# Altium PCB DB42.PcbDoc (part 7 of 8)
Units mil, origin at the board's own origin, x right, y up, seen from the top; angles counter-clockwise.
Board outline 3236.22 x 4456.69 mil, 8 copper layers (Top Layer, MidLayer1, MidLayer2, GND-Layer5, MidLayer3, VCC, MidLayer4, Bottom Layer), stack 62.194 mil thick; 214 components, 470 nets, 1802 pads, 1663 vias.
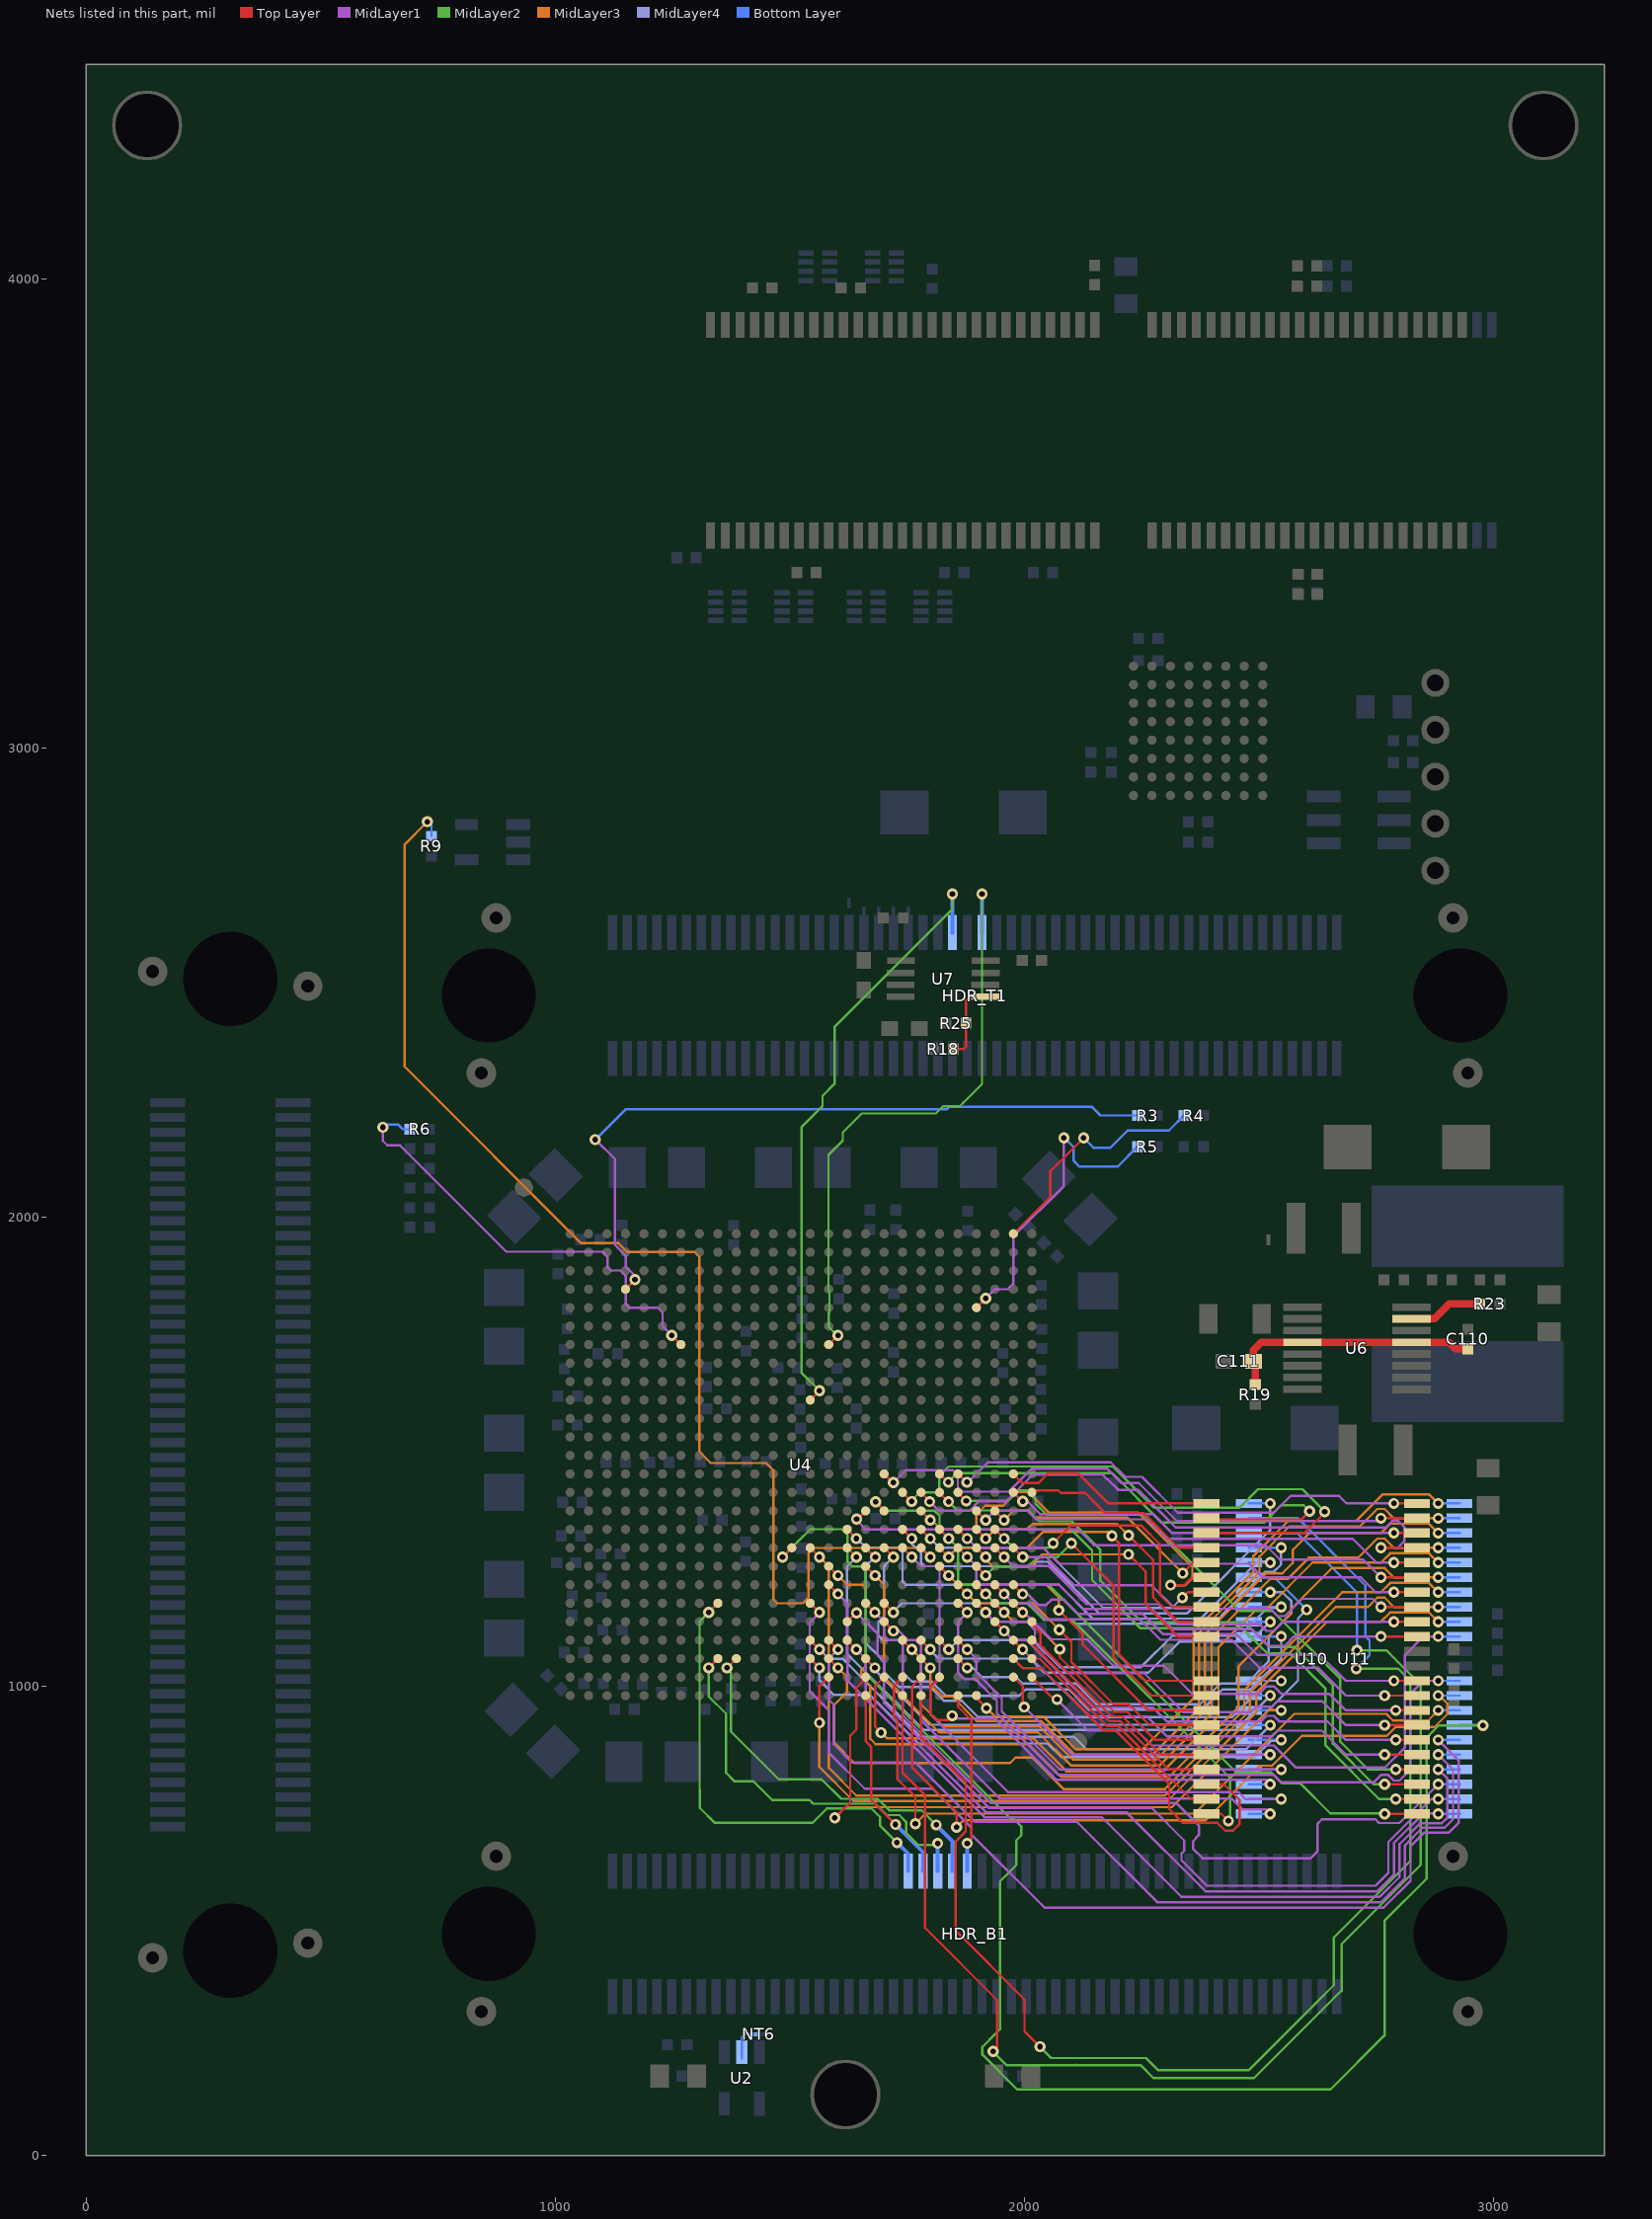
[diagram p13: the nets of this part, all layers, seen from the top]

## Via types
v1: diameter 23.62, hole 11.81, Top Layer to Bottom Layer, 1081 vias
v2: diameter 23.62, hole 11.81, Top Layer to Bottom Layer, tented both sides, 466 vias
v3: diameter 27.56, hole 15.75, Top Layer to Bottom Layer, 116 vias

## Nets (pads, with @x,y where several pads share a name; then routed paths per layer and width w, separated by ;. In a path a pad name is that pad's centre, name@x,y a point inside that pad or via, vN(x,y) a via of type N, cw(c..) or ccw(c..) an arc to the next point about the centre after c; other vN are vias at no path point) (continued)
SPI_MODE: HDR_T1.52 U4.G15 | length 1310.7
  Top Layer w5: U4.G15@1582.68,1728.35 v1(1602.36,1748.03)
  MidLayer2 w5: v1(1602.36,1748.03) 1600.52,1748.03 1592.34,1756.21 1583.05,1765.5 1583.05,1795.6 1584.24,1796.78 1584.24,1843.03 1582.3,1844.97 1582.3,2132.33 1612.78,2162.8 1612.78,2180.54 1653.12,2220.89 1811.05,2220.89 1826.28,2236.13 1861.72,2236.13 1868.9,2243.31 ; 1869.09,2243.11 1909.45,2283.47 v2(1909.45,2688.98)
  Bottom Layer w7.87: HDR_T1.52@1909.45,2606.3 v2(1909.45,2688.98)
SPI_SEL: HDR_T1.48 U4.K14 | length 1318.3
  Top Layer w5: U4.K14@1543.31,1610.24 v1(1562.99,1629.92)
  MidLayer2 w5: v1(1562.99,1629.92) 1525.2,1667.72 1525.2,2192.35 1569.44,2236.59 1569.44,2258.24 1595.06,2283.86 1595.06,2405.41 1846.46,2656.8 v2(1846.46,2688.98)
  Bottom Layer w7.87: HDR_T1.48@1846.46,2606.3 v2(1846.46,2688.98)
SRAM1_A0: U4.AB18 U11.1 | length 1130.6
  Top Layer w5: U4.AB18@1700.79,1137.8 v1(1720.47,1118.11)
  MidLayer1 w5: v1(1720.47,1118.11) 1732.28,1118.11 1751.97,1098.43 1768.11,1098.43 1779.15,1087.38 1779.15,928.72 1946.85,761.02 2441.14,761.02 2464.13,738.03 2513.94,738.03 v1(2523.62,728.35)
  Bottom Layer w5: U11.1@2478.44,728.34 v1(2523.62,728.35)
SRAM1_A1: U4.V19 U11.2 | length 1306.2
  Top Layer w5: U4.V19@1740.16,1295.28 v1(1759.84,1275.59)
  MidLayer1 w5: v1(1759.84,1275.59) 1779.53,1255.91 1812.2,1255.91 1818.9,1249.21 1818.9,1016.93 1799.7,997.74 1799.7,939.67 1964.96,774.41 2456.04,774.41 2470.61,759.84 v1(2547.24,759.84)
  Bottom Layer w5: U11.2@2478.44,759.83 v1(2547.24,759.84)
SRAM1_A2: U4.AE21 U11.3 | length 926
  Top Layer w5: U4.AE21@1818.9,1019.68 1818.9,1018.9 1799.13,999.13 1799.13,941.42 1812.49,928.06 1836.32,928.06 v1(1845.61,937.34)
  MidLayer1 w5: v1(1845.61,937.34) 1851.46,931.5 1936.63,931.5 2067.1,801.02 2513.94,801.02 v1(2523.62,791.34)
  Bottom Layer w5: U11.3@2478.44,791.33 v1(2523.62,791.34)
SRAM1_A3: U4.AC22 U11.4 | length 906.3
  Top Layer w5: U4.AC22@1858.27,1098.42 v1(1877.95,1078.74)
  MidLayer1 w5: v1(1877.95,1078.74) 1897.26,1059.43 1897.26,1029.53 1951.57,975.22 1951.57,946.46 2075.2,822.83 v1(2547.24,822.83)
  Bottom Layer w5: U11.4@2478.44,822.83 v1(2547.24,822.83)
SRAM1_A4: U4.AE25 U11.5 | length 684.7
  Top Layer w5: U4.AE25@1976.38,1019.68 1996.46,999.61 1996.46,959.06 v1(1999.61,955.91)
  MidLayer1 w5: v1(1999.61,955.91) 2101.18,854.33 v1(2523.62,854.33)
  Bottom Layer w5: U11.5@2478.44,854.32 v1(2523.62,854.33)
SRAM1_A5: U4.U16 U11.18 | length 1110.9
  Top Layer w5: U4.U16@1622.05,1334.65 v1(1641.73,1314.96)
  MidLayer4 w5: v1@1642.52,1314.96 1662.2,1295.28 1731.89,1295.28 1740.16,1287.01 1740.16,1223.23 1746.85,1216.54 2072.98,1216.54 2145.16,1144.35 2375.45,1144.35 2496.85,1265.75 v1@2521.85,1265.75
  Bottom Layer w5: U11.18@2478.44,1263.77 v1(2523.83,1263.77)
SRAM1_A6: U4.AA18 U11.19 | length 1037.2
  Top Layer w5: U4.AA18@1700.79,1177.17 v1(1720.47,1157.48)
  MidLayer4 w5: v1@1719.68,1158.27 1738.58,1177.17 2006.07,1177.17 2040.82,1142.42 ; 2040.82,1141.44 2096.9,1141.44 2104.78,1133.57 2403.91,1133.57 2420.64,1150.3 ; 2420.11,1150.82 2453.95,1184.66 2513.61,1244.32 2531.72,1244.32 2546.85,1259.45 v1@2546.85,1294.88
  Bottom Layer w5: U11.19@2478.44,1295.27 v1(2547.24,1295.28)
SRAM1_A7: U4.AF19 U11.20 | length 2986.5
  Top Layer w5: U4.AF19@1740.16,980.31 1740.16,815.75 1788.19,767.72 1788.19,485.04 1941.73,331.5 1941.73,230.71 v1(1933.07,222.05)
  MidLayer2 w5: v1@1932.28,222.44 1932.28,222.05 1932.28,221.65 1932.48,221.46 1961.02,192.91 2107.87,192.91 ; 2108.27,193.31 2107.87,192.91 ; 2675.98,350.39 2675.98,351.97 ; v1(2708.66,1076.77) 2771.26,1076.77 2788.34,1059.69 2844.49,1003.54 2844.49,825.98 ; 2844.09,826.38 2844.49,825.98 ; 2107.87,192.91 2247.24,192.91 2274.8,165.35 2489.37,165.35 2675.98,351.97 ; 2675.98,351.97 2675.98,450.79 2844.49,619.29 2844.49,825.98
  Bottom Layer w5: U11.20@2478.44,1326.76 2581.51,1326.76 2603.35,1304.92 ; 2603.54,1305.12 2708.66,1200 v1(2708.66,1076.77)
SRAM1_A8: U4.AF20 U11.21 | length 2934.3
  Top Layer w5: U4.AF20@1779.53,980.31 1779.53,890.55 1857.87,812.2 ; 1857.87,811.42 1872.44,796.85 ; 1872.83,796.85 1874.85,794.83 1874.85,690.6 1862.2,677.95 1853.54,669.29 1853.54,479.13 2000,332.68 2000,264.96 v1(2032.94,232.02)
  MidLayer2 w5: v1(2032.94,232.02) 2057.09,207.87 2258.66,207.87 2284.25,182.28 2478.74,182.28 2620.95,324.49 2659.45,362.99 2659.45,464.57 2822.44,627.56 2822.44,1011.45 2816.16,1017.73 2796.06,1037.8 v1(2707.09,1037.8)
  Bottom Layer w5: U11.21@2478.44,1358.26 2583.07,1358.27 2642.91,1298.43 2658.02,1283.32 2726.77,1214.57 2726.77,1106.69 2729.53,1103.94 2735.71,1097.75 2735.71,1066.42 v1(2707.09,1037.8)
SRAM1_A9: U4.U19 U11.22 | length 1061
  Top Layer w5: U4.U19@1740.16,1334.65 v1(1759.84,1314.96)
  MidLayer4 w5: v1@1759.84,1316.14 v1(1759.84,1314.96) 1759.84,1303.39 1779.53,1283.71 1779.53,1262.99 1786.61,1255.91 2014.57,1255.91 2024.09,1265.42 2049.2,1265.42 2159.45,1155.18 2346.12,1155.18 2523.23,1332.28 v1@2523.23,1389.15
  Bottom Layer w5: U11.22@2478.44,1389.75 v1(2523.83,1389.75)
SRAM1_A10: U4.AF23 U11.23 | length 1416.3
  Top Layer w5: U4.AF23@1897.64,980.31 1897.64,974.8 v1(1918.9,953.54)
  MidLayer3 w5: v1(1918.9,953.54) 1936.61,935.83 2039.83,935.83 2109.52,866.14 2251.58,866.14 2360.63,975.2 2360.63,1117.29 2488.04,1244.7 2488.04,1278.3 2562.4,1352.66 2707.38,1352.66 2764.17,1409.45 2862.2,1409.45 v1(2881.9,1389.75)
  Bottom Layer w5: v1(2881.9,1389.75) U11.23@2927.25,1389.75
SRAM1_A11: U4.AD20 U11.24 | length 1592.3
  Top Layer w5: U4.AD20@1779.53,1059.05 v1(1799.21,1039.37)
  MidLayer3 w5: v1(1799.21,1039.37) 1799.21,1003.54 1824.02,978.74 1845.67,978.74 1898.58,925.83 2035.69,925.83 2105.37,856.14 2106.56,856.14 2107.98,854.72 2273.62,854.72 2372.05,953.15 2372.05,1114.57 2500.79,1243.31 2500.79,1276.38 ; 2500.63,1276.54 2564.64,1340.55 2714.57,1340.55 2751.97,1377.95 2767.72,1377.95 2787.41,1358.26 v1(2881.9,1358.26)
  Bottom Layer w5: v1(2881.9,1358.26) U11.24@2927.25,1358.26
SRAM1_A12: U4.AC19 U11.25 | length 1677.4
  Top Layer w5: U4.AC19@1740.16,1098.42 v1(1759.84,1078.74)
  MidLayer3 w5: v1(1759.84,1078.74) 1761.42,1077.17 1779.53,1059.06 1779.53,962 1827.35,914.17 2033.2,914.17 2101.23,846.14 2101.86,846.14 2103.91,844.09 2280.71,844.09 2384.65,948.03 2384.65,1111.02 2514.57,1240.94 2550,1240.94 2572.05,1262.99 2572.05,1290.95 2607.48,1326.38 2759.45,1326.38 2779.53,1346.46 2862.2,1346.46 v1(2881.9,1326.76)
  Bottom Layer w5: v1(2881.9,1326.76) U11.25@2927.25,1326.76
SRAM1_A13: U4.W17 U11.26 | length 1862.4
  Top Layer w5: U4.W17@1661.42,1255.91 v1(1681.5,1236.22)
  MidLayer3 w5: v1@1679.92,1237.01 1680.31,1237.01 1681.3,1236.02 1700.79,1216.54 1700.79,1019 1817.82,901.97 2029.03,901.97 2099.9,831.1 2287.4,831.1 2398.82,942.52 2398.82,1103.94 2523.62,1228.74 2560.63,1228.74 2605.91,1274.02 2711.02,1274.02 2751.97,1314.96 2767.72,1314.96 2787.41,1295.27 v1(2881.9,1295.27)
  Bottom Layer w5: v1(2881.9,1295.27) U11.26@2927.25,1295.27
SRAM1_A14: U4.AE18 U11.27 | length 1685.3
  Top Layer w5: v1(1694.45,901.34) 1681.46,914.34 1681.46,1000.71 1700.43,1019.68 U4.AE18@1700.79,1019.68
  MidLayer3 w5: v1(1694.45,901.34) 1706.28,889.51 2018.49,889.51 2089.1,818.9 2295.67,818.9 2413.58,936.81 2413.58,1083.27 2496.46,1166.14 2516.54,1166.14 2614.17,1263.78 2759.84,1263.78 2779.53,1283.46 2862.2,1283.46 v1(2881.9,1263.77)
  Bottom Layer w5: v1(2881.9,1263.77) U11.27@2927.25,1263.77
SRAM1_A15: U4.AA17 U11.42 | length 1750
  Top Layer w5: U4.AA17@1661.42,1177.17 v1(1681.1,1157.48)
  MidLayer1 w5: v1(1681.1,1157.48) 1700.41,1138.17 1700.41,1107.46 1709.82,1098.05 1732.27,1098.05 1740.53,1089.78 1740.53,938.84 1928.35,751.02 2323.78,751.02 2371.65,703.15 2371.65,683.19 2365.8,677.33 2365.8,676.03 2359.06,669.29 2359.06,654.33 2379.53,633.86 2610.24,633.86 2624.26,647.88 2624.26,706.94 2633.86,716.54 2748.03,716.54 2755.91,708.66 2799.21,708.66 v1(2881.9,791.33)
  Bottom Layer w5: v1(2881.9,791.33) U11.42@2927.25,791.33
SRAM1_A16: U4.AB16 U11.43 | length 1781.7
  Top Layer w5: U4.AB16@1622.05,1137.8 1622.44,1137.8 1641.73,1157.09 v1@1642.52,1157.87
  MidLayer1 w5: v1(1642.13,1156.69) 1642.52,1156.69 1686.61,1112.6 1686.61,1068.5 1700.79,1054.33 1700.79,964.31 1924.07,741.02 2270.88,741.02 2340.55,671.35 2340.55,649.21 2334.65,643.31 2334.65,629.13 2388.73,575.05 2748.28,575.05 2775.59,602.36 2775.59,668.39 2867.03,759.83 v1(2881.9,759.83)
  Bottom Layer w5: v1(2881.9,759.83) U11.43@2927.25,759.83
SRAM1_A17: U4.AC16 U11.44 | length 1675.8
  Top Layer w5: U4.AC16@1622.05,1098.42 v1(1641.73,1078.74)
  MidLayer1 w5: v1(1641.73,1078.74) 1661.79,1058.68 1661.79,988.21 1918.98,731.02 2217.98,731.02 2385.76,563.24 2752.21,563.24 2787.4,598.43 2787.4,666.06 2850.28,728.93 v1@2881.3,728.93
  Bottom Layer w5: v1(2881.9,728.34) U11.44@2927.25,728.34
SRAM1_A18: U4.W15 U11.28 | length 1971.8
  Top Layer w5: U4.W15@1582.68,1255.91 v1(1602.36,1236.22)
  MidLayer3 w5: v1(1602.36,1236.22) 1622.05,1216.54 1655.91,1216.54 1661.42,1211.02 1661.42,1157.56 1661.79,1157.19 1661.79,1044.08 1651.97,1034.25 1651.97,1021 1671,1001.97 1671,888.38 1682.68,876.7 2008.38,876.7 2078.21,806.88 2307.67,806.88 2455.91,955.12 2455.91,1042.52 2567.72,1154.33 2567.72,1164.57 2655.12,1251.97 2767.72,1251.97 2787.41,1232.28 v1(2881.9,1232.27)
  Bottom Layer w5: v1(2881.9,1232.27) U11.28@2927.25,1232.27
SRAM1_D0: U4.AC14 U11.7 | length 1144.9
  Top Layer w5: U4.AC14@1543.31,1098.42 v1(1562.99,1078.74)
  MidLayer4 w5: v1(1562.99,1078.74) 1582.99,1058.74 1612.82,1058.74 1779.07,892.49 2105.76,892.49 2132.08,866.17 2472.69,866.17 v1(2523.83,917.3) v1@2524.99,916.14
  Bottom Layer w5: U11.7@2478.44,917.31 v1(2523.83,917.3)
SRAM1_D1: U4.AE17 U11.8 | length 1441.3
  Top Layer w5: v1(1595.67,719.68) 1605.49,729.51 1628.52,752.54 1628.52,894.52 1641.54,907.54 1641.54,997.32 U4.AE17@1662.28,1018.07
  MidLayer3 w5: v1(1595.67,719.68) 1618.5,742.52 2314.17,742.52 2520.47,948.82 v1(2547.24,948.82)
  Bottom Layer w5: U11.8@2478.44,948.81 v1(2547.24,948.82)
SRAM1_D2: U4.AD17 U11.9 | length 994.7
  Top Layer w5: U4.AD17@1661.42,1059.05 v1(1681.1,1039.37)
  MidLayer4 w5: v1(1681.1,1039.37) 1681.1,1034.74 1797.81,918.03 2461.56,918.03 v1(2523.83,980.31)
  Bottom Layer w5: U11.9@2478.44,980.31 v1(2523.83,980.31)
SRAM1_D3: U4.V17 U11.10 | length 1288.6
  Top Layer w5: U4.V17@1661.42,1295.28 v1@1681.1,1275.59
  MidLayer4 w5: v1@1681.1,1275.59 1661.42,1255.91 1661.42,1157.56 1661.79,1157.19 1661.79,1091.75 1689.4,1064.14 1700.79,1052.76 1700.79,1030.25 1710.9,1020.13 ; 1711.18,1020.41 1732.82,998.76 1798.75,998.76 1828.27,969.24 1866.65,969.24 1901.71,934.18 2442.45,934.18 2461.23,952.96 2520.08,1011.81 v1(2547.24,1011.81)
  Bottom Layer w5: U11.10@2478.44,1011.8 v1(2547.24,1011.81) v1@2551.18,1011.81
  other v1: 1682.28,1275.59
SRAM1_D4: U4.V18 U11.13 | length 1342.9
  Top Layer w5: U4.V18@1700.79,1295.28 v1(1720.47,1275.59)
  MidLayer4 w5: v1(1720.47,1275.59) 1707.75,1262.87 1700.81,1255.92 1700.81,1149.63 1688.58,1137.4 1688.58,1108.66 1698.82,1098.43 1731.1,1098.43 1740.16,1089.37 1740.16,1030.32 1742.58,1027.89 1760.54,1009.93 1802.39,1009.93 1832.3,980.02 1989.08,980.02 2002.36,993.31 2094.69,993.31 2138,950 2378.69,950 2422,993.31 2481.1,993.31 2547.24,1059.45 v1(2547.24,1106.3)
  Bottom Layer w5: U11.13@2478.44,1106.29 v1(2547.24,1106.3) v1@2551.18,1106.3
SRAM1_D5: U4.AC20 U11.14 | length 870.1
  Top Layer w5: U4.AC20@1779.53,1098.42 v1(1799.21,1078.74)
  MidLayer4 w5: v1@1798.43,1079.92 1798.43,1078.74 1798.43,1077.17 1816.54,1059.06 2012.6,1059.06 2042.39,1029.26 2264.1,1029.26 2330.11,1095.28 2481.32,1095.28 v1(2523.83,1137.79)
  Bottom Layer w5: U11.14@2478.44,1137.79 v1(2523.83,1137.79) v1@2527.77,1137.79
SRAM1_D6: U4.AC21 U11.15 | length 889.9
  Top Layer w5: U4.AC21@1818.9,1098.42 v1(1838.58,1078.74)
  MidLayer4 w5: v1@1838.98,1078.74 1858.66,1098.43 2017.72,1098.43 2075.07,1041.07 2248.16,1041.07 2315.35,1108.27 2459.06,1108.27 2518.11,1167.32 2545.28,1167.32 v1(2547.24,1169.29)
  Bottom Layer w5: U11.15@2478.44,1169.28 v1(2547.24,1169.29)
SRAM1_D7: U4.AD22 U11.16 | length 992.6
  Top Layer w5: U4.AD22@1858.27,1059.05 v1(1877.95,1039.37)
  MidLayer4 w5: v1@1876.38,1039.76 1877.95,1039.76 1889.31,1039.76 1909.39,1019.68 1982.68,1019.68 1996.46,1005.91 2109.09,1005.91 2153,962 2374.09,962 2418,1005.91 2473.23,1005.91 2520.08,1052.76 2520.08,1106.69 2548.82,1135.43 2548.82,1135.83 2569.01,1156.02 2569.01,1180.99 2549.21,1200.79 v1@2523.84,1200.79
  Bottom Layer w5: U11.16@2478.44,1200.78 v1(2523.83,1200.78) v1@2527.77,1200.78
SRAM1_D8: U4.AD15 U11.29 | length 1804.8
  Top Layer w5: U4.AD15@1582.68,1059.05 v1(1602.36,1039.37)
  MidLayer3 w5: v1(1602.36,1039.37) 1621.71,1020.02 1621.71,987.85 1610.24,976.38 1594.49,960.63 1594.49,879.29 1637.42,836.36 1968.94,836.36 1980.79,848.21 2016.22,848.21 2083.32,781.1 2299.24,781.1 2468.41,950.26 2468.41,991.63 2677.56,1200.79 2759.84,1200.79 2779.53,1220.47 2862.2,1220.47 v1(2881.9,1200.78)
  Bottom Layer w5: v1(2881.9,1200.78) U11.29@2927.25,1200.78
SRAM1_D9: U4.V14 U11.30 | length 2059.7
  Top Layer w5: U4.V14@1543.31,1295.28 v1(1562.99,1275.59)
  MidLayer3 w5: v1(1562.99,1275.59) 1582.68,1255.91 1582.68,826.32 1641.68,767.32 2299.61,767.32 2480.31,948.03 2480.31,986.62 2662.99,1169.29 2732.28,1169.29 2751.97,1188.98 2767.72,1188.98 2787.41,1169.29 v1(2881.9,1169.28)
  Bottom Layer w5: v1(2881.9,1169.28) U11.30@2927.25,1169.28
SRAM1_D10: U4.AE15 U11.31 | length 1793.4
  Top Layer w5: v1(1562.99,922.44) 1562.99,1000 U4.AE15@1582.54,1019.55 ; U4.AE15@1582.4,1019.68 U4.AE15@1582.54,1019.55 ; U4.AE15@1582.68,1019.68 U4.AE15@1582.54,1019.55
  MidLayer3 w5: v1@1563.19,922.24 v1(1562.99,922.44) 1562.99,828.01 1635.49,755.51 2304.72,755.51 2493.7,944.49 2493.7,985.73 2645.77,1137.8 2759.84,1137.8 2779.53,1157.48 2862.2,1157.48 v1(2881.9,1137.79)
  Bottom Layer w5: v1(2881.9,1137.79) U11.31@2927.25,1137.79
SRAM1_D11: U4.AE26 U11.32 | length 1226.8
  Top Layer w5: U4.AE26@2015.75,1019.68 2063.46,971.97 v1(2069.49,971.97)
  MidLayer1 w5: v1(2069.49,971.97) 2135.33,906.13 2239.54,906.13 2271.65,874.02 2531.5,874.02 2578.75,826.76 2767.71,826.76 2811.02,870.08 2811.02,1066.93 2850.39,1106.3 2858.27,1106.3 2862.59,1106.3 ; 2858.28,1106.29 v1(2881.9,1106.29)
  Bottom Layer w5: v1(2881.9,1106.29) U11.32@2927.25,1106.29
SRAM1_D12: U4.AA22 U11.35 | length 1539.8
  Top Layer w5: U4.AA22@1858.27,1177.17 v1(1877.95,1157.48)
  MidLayer1 w5: v1(1877.95,1157.48) 1858.64,1138.17 1858.64,1028.74 1871.64,1015.75 1894.49,1015.75 1940.94,969.29 1940.94,942.18 2072.1,811.02 2531.5,811.02 2547.24,795.28 2744.09,795.27 2759.84,811.02 2775.6,811.02 2787.4,799.21 2799.21,799.21 2822.83,822.83 2822.83,984.25 2850.39,1011.81 2862.2,1011.81 ; 2862.21,1011.8 v1(2881.9,1011.8)
  Bottom Layer w5: v1(2881.9,1011.8) U11.35@2927.25,1011.8
SRAM1_D13: U4.AE20 U11.36 | length 1606.8
  Top Layer w5: U4.AE20@1779.53,1019.68 1779.53,1018.94 1760.28,999.68 1760.28,827.37 1855.36,732.28 v1(1855.36,699.76)
  MidLayer3 w5: v1(1855.36,699.76) 1869.77,714.17 2385.83,714.17 2461.61,789.96 ; 2461.42,790.16 2501.97,830.71 2526.77,830.71 ; 2527.17,830.32 2591.34,894.49 2772.44,894.49 2791.34,913.39 2874.01,913.39 2901.45,940.82 2901.45,963.12 v1@2883.08,981.49
  Bottom Layer w5: v1(2881.9,980.31) U11.36@2927.25,980.31
SRAM1_D14: U4.AE19 U11.37 | length 1611.2
  Top Layer w5: 1721.16,1000.49 1740.16,1019.49 U4.AE19@1740.16,1019.68 ; 1721.26,1000.39 1721.26,935.43 1729.13,927.56 1729.13,802.36 1767.32,764.17 v1(1767.32,707.09)
  MidLayer3 w5: v1(1767.32,707.09) 1788.98,728.74 2362.6,728.74 2575.2,941.34 2771.26,941.34 2785.43,927.17 2860.26,927.17 v1(2881.9,948.81)
  Bottom Layer w5: v1(2881.9,948.81) U11.37@2927.25,948.81
SRAM1_D15: U4.V13 U11.38 | length 3294.1
  Top Layer w5: v1(1484.25,1275.59) U4.V13@1503.94,1295.28
  MidLayer2 w5: v1(1484.25,1275.59) 1517.25,1308.59 1543.68,1335.02 1610.24,1335.02 1622.42,1322.83 1622.42,1266.18 1633.07,1255.53 1651.16,1255.53 1661.97,1244.72 1661.97,1230.48 1661.02,1229.53 1661.02,1196.15 1661.85,1195.32 1661.85,1174.02 ; 1661.79,1173.96 1661.79,1026.21 1970.28,717.72 1977.17,717.72 1993.31,701.57 1993.31,682.28 1982.68,671.65 1982.68,619.29 1948.03,584.65 1948.03,269.29 1940.17,261.43 1910.24,231.5 1910.24,214.96 1984.25,140.94 2652.36,140.94 2767.32,255.91 2767.32,500.1 2857.48,590.26 2857.48,890.94 2870.54,904 2883.07,916.54 v1(2977.17,916.54)
  Bottom Layer w5: U11.38@2927.25,917.31 v1@2976.39,917.31
SRAM1_NBHE: U4.AC15 U11.40 | length 2012.8
  Top Layer w5: U4.AC15@1582.68,1098.42 v1(1602.36,1078.74)
  MidLayer1 w5: v1(1602.36,1078.74) 1582.68,1059.05 1582.68,971.79 1593.1,961.37 1593.1,876.74 1632.46,837.38 1768.25,837.38 1894.61,711.02 2111.98,711.02 2282.89,540.11 2760.58,540.11 2811.02,590.55 2811.02,661.4 2848.23,698.6 2895.45,698.6 2913.39,716.54 2913.39,822.83 v1(2881.9,854.32)
  Bottom Layer w5: v1(2881.9,854.32) U11.40@2927.25,854.32
SRAM1_NBLE: U4.AA14 U11.39 | length 2198.7
  Top Layer w5: U4.AA14@1543.31,1177.17 v1(1562.99,1157.48)
  MidLayer1 w5: v1@1564.17,1157.48 1563.58,1156.89 1542.13,1135.43 1542.13,990.05 1582.36,949.82 1582.36,858.95 1659.41,781.89 1804.06,781.89 1886.61,699.34 1886.61,684.39 2042.46,528.54 2765.75,528.54 2822.83,585.63 2822.83,659.07 2852.37,688.6 2905.14,688.6 2925.2,708.66 2925.2,842.52 v1(2881.9,885.82)
  Bottom Layer w5: v1(2881.9,885.82) U11.39@2927.25,885.82
SRAM1_NCS: U4.AD14 U11.6 | length 1194.4
  Top Layer w5: U4.AD14@1543.31,1059.05 v1(1562.99,1039.37)
  MidLayer4 w5: v1(1562.99,1039.37) 1562.99,1012.71 1594.23,981.47 1670.41,981.47 1773.61,878.27 2049.73,878.27 2078.81,849.19 2490.63,849.19 2524.9,883.46 2544.88,883.46 v1(2547.24,885.83)
  Bottom Layer w5: U11.6@2478.44,885.82 v1(2547.24,885.83) v1@2551.18,885.83
SRAM1_NOE: U4.Y15 U11.41 | length 1957.1
  Top Layer w5: U4.Y15@1582.68,1216.54 v1(1602.36,1196.85)
  MidLayer1 w5: v1(1602.36,1196.85) 1622.42,1176.79 1622.42,1013.01 1914.41,721.02 2164.58,721.02 2333.93,551.67 2757.38,551.67 2799.21,593.5 2799.21,663.73 2844.08,708.6 2889.7,708.6 2901.57,720.47 2901.57,803.15 v1(2881.9,822.83)
  Bottom Layer w5: v1(2881.9,822.83) U11.41@2927.25,822.83
SRAM1_NWE: U4.V16 U11.17 | length 1624.4
  Top Layer w5: U4.V16@1622.05,1295.28 v1(1641.73,1275.59)
  MidLayer4 w5: v1(1641.73,1275.59) 1622.05,1255.9 1622.05,1069.19 1783.92,907.32 2478.18,907.32 2501.61,930.74 2543.7,972.83 2583.07,1012.2 2583.07,1144.88 v1(2601.57,1163.39)
  Bottom Layer w5: U11.17@2478.44,1232.28 2479.24,1231.83 2533.13,1231.83 v1(2601.57,1163.39)
SRAM2_A0: U4.U21 U10.1 | length 1308.7
  Top Layer w5: U4.U21@1818.9,1334.65 v1(1838.58,1314.96) ; v1(2767.69,728.34) U10.1@2836.71,728.34
  MidLayer2 w5: v1@1839.76,1313.78 1858.26,1295.27 1858.26,1224.61 1866.65,1216.22 2051.64,1216.22 2450.97,816.9 2525.75,816.9 2549.54,793.1 2587.92,793.1 2651.92,729.1 2766.93,729.1 v1(2767.69,728.34)
SRAM2_A1: U4.T18 U10.2 | length 1563.2
  Top Layer w5: v1(1682.68,1393.31) 1700.79,1375.2 U4.T18@1700.79,1374.02 ; v1(2791.34,759.84) U10.2@2836.71,759.83
  MidLayer2 w5: v1(1682.68,1393.31) 1701.97,1374.02 1808.66,1374.02 1818.9,1363.78 1818.9,1342.52 1826.77,1334.64 2098.87,1334.64 2144.14,1289.38 2144.14,1227.05 2247.56,1123.62 2464.14,1123.62 2517.66,1070.1 2566.91,1070.1 2641.73,995.28 2641.73,874.02 2755.91,759.84 v1(2791.34,759.84)
SRAM2_A2: U4.R21 U10.3 | length 1384.3
  Top Layer w5: U4.R21@1818.9,1413.39 1818.9,1412.2 v1@1835.83,1395.28 ; v1(2767.69,791.34) U10.3@2836.71,791.33
  MidLayer2 w5: v1(1838.19,1393.7) 1857.09,1374.8 2008.22,1374.8 2031.21,1351.81 2100.84,1351.81 2161.85,1290.81 2161.85,1225.08 2250.45,1136.48 2469.41,1136.48 2521.99,1083.89 2575.58,1083.89 2657.48,1001.99 2657.48,877.95 2744.1,791.34 v1(2767.69,791.34)
SRAM2_A3: U4.R22 U10.4 | length 1327.1
  Top Layer w5: U4.R22@1858.27,1413.39 1858.27,1412.6 v1@1875.59,1395.28 ; v1(2791.34,822.83) U10.4@2836.71,822.83
  MidLayer2 w5: v1(1875.71,1395.15) 1964.45,1395.15 1986.61,1417.32 2007.48,1417.32 2023.23,1401.57 2023.23,1389.76 2046.85,1366.14 2253.54,1366.14 2345.5,1274.19 2458.98,1160.7 2528.32,1160.7 2673.23,1015.79 2673.23,881.89 2732.28,822.83 v1(2791.34,822.83)
SRAM2_A4: U4.AC25 U10.5 | length 963.4
  Top Layer w5: U4.AC25@1976.38,1098.42 v1(1996.06,1078.74) ; v1(2767.69,854.33) U10.5@2836.71,854.32
  MidLayer1 w5: v1(1996.06,1078.74) 2138.63,936.17 2260.68,936.17 2303.15,893.7 2527.56,893.7 2539.37,905.51 2633.86,905.51 2685.04,854.33 v1@2759.84,854.31
SRAM2_A5: U4.T23 U10.18 | length 1001.7
  Top Layer w5: U4.T23@1897.64,1374.02 v1(1917.32,1354.33) ; v1@2787.4,1263.77 U10.18@2836.71,1263.77
  MidLayer1 w5: v1(1917.32,1354.33) 1917.32,1355.51 1935.83,1374.02 2006.69,1374.02 2024.8,1355.91 2262.2,1355.91 2303.49,1314.62 2699.44,1314.62 2750.28,1263.78 v1(2787.4,1263.78)
SRAM2_A6: U4.R20 U10.19 | length 1297.3
  Top Layer w5: U4.R20@1779.53,1413.39 1779.53,1412.99 v1@1796.85,1395.67 ; v1(2759.84,1295.28) U10.19@2836.71,1295.27
  MidLayer1 w5: v1(1798.03,1393.7) 1817.73,1374 1882.68,1374 1903.39,1394.71 1961.64,1394.71 2018.49,1451.56 2166.15,1451.56 2176.38,1441.34 ; 2176.77,1441.73 2199.61,1418.9 2241.73,1418.9 2307.08,1353.55 2322.44,1338.2 2769.7,1338.2 2783.46,1351.97 2797.24,1351.97 2809.84,1339.37 2809.84,1309.45 2795.67,1295.28 v1(2759.84,1295.28)
SRAM2_A7: U4.R25 U10.20 | length 896.6
  Top Layer w5: U4.R25@1975.98,1413.39 U4.R25@1975.98,1413.78 ; U4.R25@1976.38,1413.39 1976.38,1412.6 1995.47,1393.5 v1@1995.67,1393.31 ; v1(2787.4,1326.77) U10.20@2836.71,1326.76
  MidLayer1 w5: v1@1996.65,1394.29 1996.58,1394.22 2006.18,1394.22 2033.07,1367.32 2274.41,1367.32 2314.96,1326.77 v1(2787.4,1326.77)
  other v1: 1996.46,1394.49
SRAM2_A8: U4.P18 U10.21 | length 1259.2
  Top Layer w5: U4.P18@1700.79,1452.76 v1@1720.47,1433.07 ; v1(2759.84,1358.27) U10.21@2836.71,1358.26
  MidLayer1 w5: v1(1720.47,1434.25) 1747.22,1461 1847,1461 1858,1450 1858,1423 1866.07,1414.93 1966.51,1414.93 2015.75,1464.17 2175.98,1464.17 2205.38,1434.78 2206.69,1433.46 2243.7,1433.46 2266.93,1410.24 2324.8,1352.36 2753.94,1352.36 v1(2759.84,1358.27)
SRAM2_A9: U4.P22 U10.22 | length 1070.9
  Top Layer w5: U4.P22@1858.27,1452.76 v1(1877.56,1435.04) ; v1(2787.4,1389.76) U10.22@2836.71,1389.76
  MidLayer1 w5: v1@1876.77,1432.28 1878.54,1434.06 1922.05,1477.56 2183.5,1477.56 2208.48,1452.58 2214.57,1446.49 2250.36,1446.49 2326.77,1370.08 2531.5,1370.08 2567.32,1405.91 2670.47,1405.91 2686.61,1389.76 v1(2787.4,1389.76)
SRAM2_A10: U4.P25 U10.23 | length 454.4
  Top Layer w5: U4.P25@1976.38,1452.76 1976.38,1452.21 1995.61,1432.98 2029.13,1432.98 2049.06,1452.9 2116.05,1452.9 2179.2,1389.76 U10.23@2387.89,1389.76
SRAM2_A11: U4.P21 U10.24 | length 1096.4
  Top Layer w5: U4.P21@1818.9,1452.76 v1(1837.8,1435.04) v1@1838.98,1433.86 ; U10.24@2389.76,1355.91 2590.63,1355.91 v1@2607.72,1372.99
  MidLayer2 w5: v1@1838.98,1433.86 1838.98,1435.04 1838.98,1437.1 1856.51,1454.63 2186.71,1454.63 2292.52,1348.82 2510.24,1348.82 2547.24,1385.83 2595.28,1385.83 v1(2607.87,1373.23)
SRAM2_A12: U4.R19 U10.25 | length 1298.1
  Top Layer w5: U4.R19@1740.16,1412.2 U4.R19@1740.16,1413.39 ; U4.R19@1740.16,1412.6 v1@1758.27,1394.49 ; U10.25@2393.31,1327.17 2596.85,1327.17 v1@2642.91,1373.23
  MidLayer2 w5: v1@1757.24,1393.58 1757.24,1393.97 1776.43,1413.16 1810.8,1413.16 1818.34,1420.7 1818.34,1448.26 1838.58,1468.51 2188.58,1468.51 2276.77,1380.32 2458.27,1380.32 2498.03,1420.08 2592.13,1420.08 v1(2639.76,1372.44)
  other v1: 1759.45,1394.09
SRAM2_A13: U4.R26 U10.26 | length 424.7
  Top Layer w5: U4.R26@2015.75,1413.39 2020.08,1417.72 2071.65,1417.72 2077.17,1412.2 2129.13,1412.2 2157.95,1383.39 2171.61,1369.73 2253.36,1369.73 2327.82,1295.27 U10.26@2387.89,1295.27
SRAM2_A14: U4.T24 U10.27 | length 531.4
  Top Layer w5: U4.T24@1937.01,1374.02 v1(1956.69,1354.33) ; v1(2337.4,1241.34) 2359.83,1263.77 U10.27@2387.89,1263.77
  MidLayer3 w5: v1(1956.69,1354.33) 1976.38,1374.02 2008.27,1374.02 2022.29,1360 2218.74,1360 v1(2337.4,1241.34)
SRAM2_A15: U4.AD25 U10.42 | length 805.5
  Top Layer w5: U4.AD25@1976.38,1059.05 1996.06,1039.37 ; 1996.85,1038.58 2036.42,1038.58 2169.25,905.75 2194.25,905.75 2204,896 ; 2204.02,896.02 2308.27,791.76 2308.27,738.58 2337.8,709.06 2411.02,709.06 2427.82,692.26 2444.23,692.26 2453.82,701.85 2458.27,706.3 2458.27,757.87 2424.81,791.33 U10.42@2387.89,791.33
SRAM2_A16: U4.AD26 U10.43 | length 496.1
  Top Layer w5: U4.AD26@2015.75,1059.05 2031.95,1059.05 2175.12,915.87 2199.12,915.87 2355.17,759.83 U10.43@2387.89,759.83
SRAM2_A17: U4.Y23 U10.44 | length 875.2
  Top Layer w5: U4.Y23@1897.64,1216.54 v1(1917.32,1196.85) ; U10.44@2370.09,728.34 U10.44@2387.89,728.34 2419.36,728.34 v1(2434.5,713.2)
  MidLayer2 w5: v1(1917.32,1196.85) 1937.01,1177.17 2007.09,1177.17 2041.83,1142.42 2100.84,1142.42 2438.35,804.91 2438.35,717.05 v1(2434.5,713.2)
SRAM2_A18: U4.T20 U10.28 | length 847.3
  Top Layer w5: U4.T20@1779.53,1374.02 v1(1799.21,1354.33) ; v1(2311.42,1215.75) 2340.55,1215.75 2356.69,1231.89 U10.28@2372.44,1231.89
  MidLayer3 w5: v1@1802.76,1354.33 1822.44,1334.65 1888.58,1334.65 1897.64,1343.7 1897.64,1366.54 1916.14,1385.04 1954.73,1385.04 1983.49,1413.8 2008.66,1413.8 2051.79,1370.67 2241.59,1370.67 2357.82,1254.45 2357.82,1230.66 2342.9,1215.75 v1(2311.42,1215.75)
SRAM2_D0: U4.AA23 U10.7 | length 1074
  Top Layer w5: U4.AA23@1897.64,1177.17 v1(1917.32,1157.48) ; v1(2767.69,917.32) U10.7@2836.71,917.32
  MidLayer1 w5: v1@1916.14,1157.48 1916.73,1156.89 1935.83,1137.8 2004.73,1137.8 2022.12,1120.41 2022.12,1096.18 2090.02,1028.28 2255.18,1028.28 2338.58,944.88 2482.35,944.88 2494.16,956.69 2527.58,956.69 2539.11,968.23 2539.11,968.5 2633.86,968.5 2685.06,917.3 v1@2759.84,917.3
SRAM2_D1: U4.AA25 U10.8 | length 964.4
  Top Layer w5: U4.AA25@1976.38,1177.17 v1(1996.06,1157.48) ; v1(2791.34,948.82) U10.8@2836.71,948.81
  MidLayer1 w5: v1@1995.67,1155.51 v1@1996.06,1155.51 ; v1(1996.06,1157.48) 1999.19,1157.48 2056.56,1100.11 2133.31,1100.11 2189.4,1044.02 2297.64,1044.02 2357.41,984.25 2500,984.25 2515.75,1000 2531.5,1000 2547.24,984.25 2649.61,984.25 2685.04,948.83 v1@2787.41,948.83
SRAM2_D2: U4.Y24 U10.9 | length 989.7
  Top Layer w5: U4.Y24@1937.01,1216.54 v1(1956.69,1196.85) ; v1(2767.69,980.31) U10.9@2836.71,980.31
  MidLayer1 w5: v1(1956.69,1196.85) 1976.38,1177.17 2011.42,1177.17 2045.88,1142.71 2246.19,1142.71 2289.77,1099.13 2441.3,1099.13 2500.34,1040.09 2625.27,1040.09 2685.04,980.32 ; 2685.04,980.29 v1@2759.84,980.29
SRAM2_D3: U4.Y25 U10.10 | length 954.3
  Top Layer w5: U4.Y25@1976.38,1216.54 v1(1996.06,1196.85) ; v1(2787.4,1011.81) U10.10@2836.71,1011.8
  MidLayer1 w5: v1(1996.06,1196.85) 2006.3,1196.85 2029.43,1173.72 2046.53,1173.72 2057.54,1184.74 2084.8,1184.74 2115.35,1154.19 2252.42,1154.19 2295.67,1110.94 2452.06,1110.94 2496.06,1066.93 2629.92,1066.93 2685.03,1011.82 v1(2787.4,1011.81)
SRAM2_D4: U4.V22 U10.13 | length 1090.3
  Top Layer w5: U4.V22@1858.27,1295.28 v1(1877.95,1275.59) ; v1(2759.84,1106.3) U10.13@2836.71,1106.29
  MidLayer1 w5: v1(1877.95,1275.59) 1897.64,1255.91 1897.64,1226.38 1906.69,1217.32 1907.48,1216.54 2073.96,1216.54 2125.7,1164.8 2271.62,1164.8 2314.37,1122.05 2484.25,1122.05 2519.68,1086.62 2555.11,1086.62 2574.79,1106.31 v1(2759.84,1106.3)
SRAM2_D5: U4.V24 U10.14 | length 983.3
  Top Layer w5: U4.V24@1937.01,1295.28 v1(1956.69,1275.59) ; v1(2787.4,1137.8) U10.14@2836.71,1137.79
  MidLayer1 w5: v1@1956.69,1273.62 v1(1956.69,1275.59) 1976.18,1256.1 2051.37,1256.1 2089.16,1218.32 ; 2089.03,1218.19 2132.37,1174.86 2285.97,1174.86 2328.14,1132.68 2501.18,1132.68 2515.75,1118.11 2531.49,1118.11 2551.17,1137.8 ; 2551.17,1137.8 v1(2787.4,1137.8)
SRAM2_D6: U4.V25 U10.15 | length 943.2
  Top Layer w5: U4.V25@1976.38,1295.28 v1@1996.06,1275.59 ; v1(2759.84,1169.29) U10.15@2836.71,1169.28
  MidLayer1 w5: v1@1996.07,1275.59 v1(1996.46,1275.59) 2046.03,1275.59 2106.38,1215.24 2271.07,1215.24 2320.95,1165.36 2523.61,1165.36 2539.36,1149.61 2555.11,1149.61 2592.11,1186.61 2742.52,1186.61 v1(2759.84,1169.29)
SRAM2_D7: U4.U22 U10.16 | length 1034.8
  Top Layer w5: U4.U22@1858.27,1334.65 v1(1877.95,1314.96) ; v1(2787.4,1200.79) U10.16@2836.71,1200.78
  MidLayer1 w5: v1@1877.56,1315.75 1877.95,1315.35 v1(1877.95,1314.96) 1897.64,1295.27 2040.49,1295.27 2074.66,1261.1 2479.08,1261.1 2508.22,1231.97 2717.15,1231.97 2748.31,1200.8 v1(2787.4,1200.79)
SRAM2_D8: U4.U20 U10.29 | length 693.6
  Top Layer w5: U4.U20@1779.53,1334.65 v1(1799.21,1314.96) ; v1@2335.43,1187.8 2336.81,1189.17 2348.42,1200.78 U10.29@2387.89,1200.78
  MidLayer4 w5: v1(1799.21,1314.96) 1799.61,1314.96 1819.29,1295.28 2039.5,1295.28 2167.75,1167.02 2314.27,1167.02 v1(2336.61,1189.37)
SRAM2_D9: U4.U24 U10.30 | length 622.7
  Top Layer w5: U4.U24@1937.01,1334.65 v1(1956.69,1314.96) ; v1(2061.02,1305.12) 2073.38,1317.48 ; 2073.29,1317.58 2098.87,1343.16 2248.44,1343.16 2288.78,1302.82 2288.78,1194.58 2314.08,1169.28 U10.30@2387.89,1169.28
  MidLayer2 w5: v1(1956.69,1314.96) 1976.58,1295.08 2050.98,1295.08 v1(2061.02,1305.12)
SRAM2_D10: U4.U23 U10.31 | length 643.5
  Top Layer w5: U4.U23@1897.64,1334.65 v1(1917.32,1314.96) ; v1(2221.87,1321.51) 2274.02,1269.36 2274.02,1189.66 2325.89,1137.79 U10.31@2387.89,1137.79
  MidLayer3 w5: v1@1918.11,1314.96 1937.8,1334.65 2005.39,1334.65 2016.86,1346.11 2197.27,1346.11 v1(2221.87,1321.51)
SRAM2_D11: U4.V23 U10.32 | length 633.7
  Top Layer w5: U4.V23@1897.64,1295.28 v1(1917.32,1275.59) ; v1(2221.87,1281.17) 2258.02,1245.02 2258.02,1174.66 2326.39,1106.29 U10.32@2387.89,1106.29
  MidLayer3 w5: v1(1917.32,1275.59) 1917.32,1270.84 1932.58,1255.58 2012.28,1255.58 2037.86,1281.17 v1(2221.87,1281.17)
SRAM2_D12: U4.V21 U10.35 | length 870.6
  Top Layer w5: U4.V21@1818.9,1295.28 v1(1838.58,1275.59) ; v1(2186.45,1320.53) 2201.21,1305.77 2201.21,1068.62 2258.03,1011.8 U10.35@2387.89,1011.8
  MidLayer3 w5: v1(1838.58,1275.59) 1838.58,1276.72 1856.81,1294.94 2005.39,1294.94 2039.83,1329.38 2177.59,1329.38 v1(2186.45,1320.53)
SRAM2_D13: U4.W23 U10.36 | length 751.1
  Top Layer w5: U4.W23@1897.64,1255.91 v1(1917.32,1236.22) ; v1(2099.86,1304.78) 2189.56,1215.08 2189.56,1061.74 2270.99,980.31 U10.36@2387.89,980.31
  MidLayer2 w5: v1(1917.32,1236.22) 1917.32,1236.4 1936.51,1255.58 2008.34,1255.58 2028.02,1275.26 2070.34,1275.26 v1(2099.86,1304.78)
SRAM2_D14: U4.W21 U10.37 | length 726.8
  Top Layer w5: U4.W21@1818.9,1255.91 v1(1838.58,1236.22) ; v1(2073.29,1162.1) 2123.74,1111.66 2123.74,1089.39 2264.32,948.81 U10.37@2387.89,948.81
  MidLayer3 w5: v1(1838.58,1236.22) 1858.27,1216.54 2046.41,1216.54 2073.29,1189.66 v1(2073.29,1162.1) v1@2074.27,1163.09
SRAM2_D15: U4.Y22 U10.38 | length 678.8
  Top Layer w5: U4.Y22@1858.27,1216.54 v1(1877.95,1196.85) ; v1(2074.27,1120.78) 2100.01,1095.04 2100.01,1051.99 2190,962 2222,962 2266.68,917.32 U10.38@2387.89,917.32
  MidLayer3 w5: v1(1877.95,1196.85) 1897.64,1177.17 2017.88,1177.17 v1(2074.27,1120.78)
SRAM2_NBHE: U4.AB26 U10.40 | length 508.9
  Top Layer w5: U4.AB26@2012.6,1137.4 2013.98,1136.02 2034,1116 2034,1088 2185.87,936.13 2208.7,936.13 2290.51,854.32 U10.40@2387.89,854.32
SRAM2_NBLE: U4.AA24 U10.39 | length 583.5
  Top Layer w5: U4.AA24@1937.01,1177.17 v1(1956.69,1157.48) ; v1(2075.26,1079.45) 2075.37,1080.65 2075.37,1079.45 2075.37,1061.63 2190.87,946.13 2218.87,946.13 2279.18,885.82 U10.39@2387.89,885.82
  MidLayer3 w5: v1@1957.48,1157.48 1977.17,1137.8 2016.91,1137.8 v1(2075.26,1079.45)
SRAM2_NCS: U4.AB24 U10.6 | length 1009.9
  Top Layer w5: U4.AB24@1937.01,1137.8 v1(1956.69,1118.11) ; v1(2791.34,885.83) U10.6@2836.71,885.82
  MidLayer1 w5: v1(1956.69,1118.11) 1976,1098.8 2003.8,1098.8 2147.6,955 2273.35,955 2303.15,925.2 2503.93,925.2 2515.75,937.01 2531.5,937.01 2543.31,925.2 2645.67,925.2 2685.03,885.83 v1@2787.41,885.83
SRAM2_NOE: U4.AC26 U10.41 | length 491.1
  Top Layer w5: U4.AC26@2015.75,1098.42 2015.75,1090.25 2179.87,926.13 2204,926.13 2307.3,822.83 U10.41@2387.89,822.83
SRAM2_NWE: U4.T17 U10.17 | length 1273.4
  Top Layer w5: v1(1642.13,1356.3) 1661.02,1374.02 U4.T17@1661.42,1374.02 ; v1(2759.84,1232.28) U10.17@2836.71,1232.28
  MidLayer1 w5: v1(1642.13,1356.3) 1660.24,1334.65 2114.27,1334.65 2148.07,1300.85 2514.12,1300.85 2544.62,1270.34 2721.78,1270.34 v1(2759.84,1232.28)
STATUS_LED: NT6.1 U2.2 | length 74.7
  Bottom Layer w5: U2.2@1397.64,207.68 U2.2@1397.63,220.47 1397.64,251.97 1404.53,258.86 NT6.1@1425.2,258.86
SUSPEND: R9.2 U4.V20 | length 2715.1
  Top Layer w5: U4.V20@1779.53,1295.28 v1(1799.21,1275.59)
  MidLayer3 w5: v1(727.18,2842.78) 678.96,2794.56 678.96,2320.27 1054.85,1944.38 1134.55,1944.38 1153.36,1925.57 1295.81,1925.57 1295.93,1925.69 1296.91,1925.69 1306.9,1915.7 1306.9,1500.45 1331.35,1476 1449.2,1476 1464.57,1460.63 1464.57,1185.04 1472.44,1177.17 1527.56,1177.17 1539.37,1188.98 1539.37,1283.46 1550.85,1294.94 1780.06,1294.94 v1@1799.21,1275.79
  Bottom Layer w5: v1(727.18,2842.78) v1@732.1,2837.86 ; v1@733.08,2837.86 736.03,2834.9 R9.2@736.03,2811.81
SW0: HDR_B1.42 U4.AA9 | length 1010.1
  Top Layer w5: v1(1326.77,1157.48) U4.AA9@1346.46,1177.17
  MidLayer2 w5: v1(1326.77,1157.48) 1307.46,1138.17 1307.46,780.85 1308,780.31 1308,741 1340,709 1548,709 1578.47,739.47 1674.31,739.47 1691.79,721.99 1691.79,703.49 v2(1728.35,666.93)
  Bottom Layer w7.87: v2(1728.35,666.93) 1751.97,643.31 HDR_B1.42@1751.97,606.3
SW1: HDR_B1.44 U4.AF17 | length 425.8
  Top Layer w5: U4.AF17@1661.42,980.31 1661.42,883.41 1673,871.82 1673,758 1684,747 ; 1683.85,746.85 v2(1725.2,705.51)
  Bottom Layer w7.87: v2(1725.2,705.51) 1783.46,647.24 HDR_B1.44@1783.47,606.3 HDR_B1.44@1783.01,607.51
SW2: HDR_B1.46 U4.AD9 | length 855.8
  Top Layer w5: v1(1326.77,1039.37) U4.AD9@1346.46,1059.05
  MidLayer2 w5: v1(1326.77,1039.37) 1326.77,978.74 1363.82,941.69 1363.82,815.74 1381.54,798.02 1421.88,798.02 1462.22,757.68 1541.93,757.68 1549.8,749.81 1682.08,749.81 1706.3,725.59 1733.07,725.59 1747.64,711.02 1747.64,687.8 1773.62,661.81 1811.42,661.81 v2(1814.96,665.35)
  Bottom Layer w7.87: HDR_B1.46@1814.96,606.3 v2(1814.96,665.35)
SW3: HDR_B1.48 U4.AD10 | length 801.2
  Top Layer w5: v1(1366.14,1039.37) U4.AD10@1385.83,1059.05
  MidLayer2 w5: v1@1364,1039 1364.89,1038.11 1374,1029 1374,904.01 1476.05,801.96 1567.51,801.96 1609.23,760.24 1687,760.24 1711.41,735.83 1780.71,735.83 v2(1811.81,704.72)
  Bottom Layer w7.87: v2@1811.02,705.51 v2(1811.81,704.72) 1846.46,670.08 HDR_B1.48@1846.46,606.3
SW4: HDR_B1.50 U4.AF22 | length 389.7
  Top Layer w5: U4.AF22@1858.27,980.31 1858.27,956.69 1887.01,927.95 1887.01,674.41 v2(1877.95,665.35)
  Bottom Layer w7.87: HDR_B1.50@1877.95,606.3 v2(1877.95,665.35)
TCK: R4.2 U4.A25 | length 517.1
  Top Layer w5: U4.A25@1976.38,1964.57 2055.28,2043.47 2055.28,2098.18 v1(2126.1,2169)
  Bottom Layer w5: v1(2126.1,2169) 2147.1,2148 2183,2148 2219.8,2184.8 2307.66,2184.8 R4.2@2339.62,2216.76
TDI: R6.2 U4.G7 | length 971.8
  Top Layer w5: v1(1248.03,1748.03) U4.G7@1267.72,1728.35
  MidLayer1 w5: v1(632.4,2191.6) 632.4,2162.48 641.73,2153.15 668.9,2153.15 895.67,1926.38 1100,1926.38 1111,1915.38 1111,1894 1118.78,1886.22 1138.78,1886.22 1149,1876 1149,1875.02 ; 1149.98,1875.02 1149.98,1816.02 1159,1807 1218.49,1807 1228.49,1797 1228.49,1767.57 v1(1248.03,1748.03)
  Bottom Layer w5: v1(632.4,2191.6) 637.9,2197.1 665.3,2197.1 675.08,2187.32 R6.2@689.74,2187.32
TDO: R5.2 U4.E23 | length 672.6
  Top Layer w5: U4.E23@1897.64,1807.09 v1(1917.32,1826.77)
  MidLayer1 w5: v1(1917.32,1826.77) 1936.84,1846.28 1964.48,1846.28 1976,1857.8 1976,1958.39 2084,2066.38 v1(2084,2169)
  Bottom Layer w5: v1@2084,2170 2084.5,2169.5 2105,2149 2105,2120 2117.41,2107.59 2198.22,2107.59 R5.2@2240.8,2150.17
TMS: R3.2 U4.D4 | length 1558.6
  Top Layer w5: U4.D4@1149.61,1846.46 1149.61,1846.61 v1(1169.65,1866.65) v1@1171,1868
  MidLayer1 w5: v1@1085,2166 1085.5,2165.5 1127,2124 1127,1941 1150,1918 1150,1895 1169.65,1875.35 v1(1169.65,1866.65)
  Bottom Layer w5: v1@1084,2164 v1(1085.14,2165.14) 1149.66,2229.66 1833.66,2229.66 1839,2235 2144,2235 2162.24,2216.76 R3.2@2240.87,2216.76
TOFF: R23.1 U6.7 | length 159.5
  Top Layer w15.75: U6.7@2824.58,1783.25 2824.8,1783.46 2874.02,1783.46 2905.51,1814.96 R23.1@2970.94,1814.96
VFILT: C110.1 C111.1 R19.2 U6.5 U6.12 | length 544.3
  Top Layer w15.75: R19.2@2492.12,1643.22 2492.12,1688.98 C111.1@2488.19,1692.91 2488.19,1716.54 2504.9,1733.25 U6.12@2592.58,1733.25 ; U6.12@2592.58,1733.25 U6.5@2824.58,1733.25 2904.53,1733.27 2918.31,1719.48 C110.1@2944.88,1719.48
VSET: R18.1 R25.1 U7.5 | length 153
  Top Layer w5: R18.1@1847.95,2358.26 1870.07,2358.26 1875.51,2363.7 R25.1@1875.51,2413.38 1875.51,2462.12 1881.89,2468.5 U7.5@1897.64,2468.5
pads on no net: HDR_B1.93 HDR_B1.95 HDR_B1.MH5 HDR_B1.MH6 HDR_L1.MH5 HDR_L1.MH6 HDR_T1.95 HDR_T1.MH5 HDR_T1.MH6 MH1.MOUNT MH2.MOUNT MH3.MOUNT U1.5 U2.1 U3.A1 U3.A8 U3.B1 U3.B4 U3.C1 U3.D1 U3.E1 U3.F8 U3.G1 U3.G8 U3.H1 U3.H8 U4.A5 U4.A7 U4.A13 U4.A17 U4.A23 U4.A24 U4.AA4 U4.AA8 U4.AA19 U4.AA20 U4.AB3 U4.AB4 U4.AB10 U4.AB17 U4.AB20 U4.AC5 U4.AC7 U4.AC17 U4.AC18 U4.AD5 U4.AD16 U4.AD23 U4.AF2 U4.AF7 U4.B24 U4.B25 U4.B26 U4.C1 U4.C2 U4.C4 U4.D1 U4.D2 U4.D5 U4.D7 U4.D12 U4.D14 U4.D15 U4.D19 U4.E6 U4.E9 U4.E11 U4.E18 U4.E20 U4.F9 U4.F10 U4.F18 U4.FID1 U4.G1 U4.G2 U4.G5 U4.G11 U4.G14 U4.G16 U4.G18 U4.G25 U4.G26 U4.H4 U4.H13 U4.H18 U4.H23 U4.H24 U4.H25 U4.H26 U4.J1 U4.J2 U4.J3 U4.J10 U4.J13 U4.J15 U4.J17 U4.K1 U4.K24 U4.L10 U4.L23 U4.M10 U4.M24 U4.N23 U4.N25 U4.N26 U4.P10 U4.R17 U4.R23 U4.R24 U4.U3 U4.U25 U4.U26 U4.V4 U4.V26 U4.W1 U4.W2 U4.W18 U4.W25 U4.W26 U4.Y3 U4.Y4 U4.Y8 U4.Y11 U4.Y16 U4.Y18 U4.Y19 U4.Y26 U5.1 U8.40 U9.40
copper on no net: | length 1092.4
  Top Layer w5: v1@1052.36,1867.32 1070.87,1885.83 ; v1(1070.83,946.26) 1070.83,979.72 ; 1070.87,1728.35 1070.87,1730.08 ; 1070.87,1846.46 v1@1090.16,1865.75 ; 1071.85,1729.36 1071.89,1729.32 ; 1110.24,1137.8 1110.63,1137.8 1110.63,1138.19 v1(1129.92,1157.48) 1149.61,1177.17 ; v1(1129.92,1196.85) 1149.61,1216.53 ; 1148.07,1885.83 1149.61,1885.83 ; v1(1169.29,1748.03) 1188.98,1728.35 ; 1188.98,1098.42 v1(1169.29,1078.74) 1188.98,1059.05 1189.66,1058.37 1189.66,1057.8 ; 1189.75,1845.68 1188.98,1846.46 1208.72,1826.72 1228.35,1807.09 ; v1(1248.03,1078.74) 1267.72,1098.42 ; v1(1248.03,1984.25) 1267.72,1964.57 ; 1307.08,1177.17 v1(1287.4,1196.85) 1307.09,1216.53 ; v1(1326.77,1787.4) 1346.46,1767.72 ; v1(1326.77,1826.77) 1346.46,1807.09 ; v1(1366.14,1118.11) 1385.83,1137.79 ; v1(1366.14,1787.4) 1385.83,1767.72 ; v1(1405.51,1196.85) 1425.2,1216.53 ; 1582.68,1846.46 1582.68,1846.85 ; 1622.05,1728.35 v1(1641.73,1748.03) ; 1661.42,1135.83 1661.42,1137.34 1661.42,1137.8 ; 1700.79,1216.54 v1(1720.47,1196.85) ; 1700.79,1255.91 v1(1720.47,1236.22) 1740.16,1216.54 ; 1700.79,1728.35 v1(1720.47,1748.03) 1700.79,1767.72 ; v1@1720.99,1197.76 1721.39,1197.76 1740.16,1216.53 ; v1(1759.84,1196.85) 1740.16,1216.54 ; 1779.53,1807.09 v1(1799.21,1826.77) ; 1897.64,1688.98 v1(1917.32,1708.66) ; 1937.01,1964.57 v1(1956.69,1984.25) ; 1938.87,1922.72 1939.49,1922.72 ; 1976.38,1255.91 v1(1996.06,1236.22) ; v1@1996.46,1747.64 1996.85,1747.24 2015.75,1728.35 ; 2015.75,1255.91 2021.65,1255.91 v1(2040.94,1236.61)
  Top Layer w7.87: 3149.61,4212.6 3149.61,4330.71
  Top Layer w10: v1@1697.34,2158.37 v1@1698.62,2159.65 ; v1(2526.38,1557.09) v1@2526.77,1556.69
  Bottom Layer w10: v1@2040.55,1238.58 2041.73,1237.4 v1@2044.88,1234.25
  Bottom Layer w11.81: v1(1248.03,1984.25) v1@1249.02,1985.24
  Bottom Layer w12: v1(1917.32,1708.66) v1@1918.31,1709.65
  other v1: 1618.11,43.31 157.48,59.06 275.59,59.06 393.7,59.06 511.81,59.06 629.92,59.06 748.03,59.06 866.14,59.06 984.25,59.06 1102.36,59.06 1220.47,59.06 1338.58,59.06 1456.69,59.06 1771.65,59.06 1889.76,59.06 2007.87,59.06 2125.98,59.06 2244.09,59.06 2362.2,59.06 2480.31,59.06 2598.43,59.06 2716.54,59.06 2834.65,59.06 2952.76,59.06 3070.87,59.06 1556.86,68.68 1679.36,68.68 59.06,118.11 3169.29,118.11 1531.5,129.92 1704.72,129.92 1556.86,191.17 1679.36,191.17 1618.11,216.54 59.06,236.22 3169.29,236.22 59.06,354.33 3169.29,354.33 59.06,472.44 3169.29,472.44 59.06,590.55 3169.29,590.55 59.06,708.66 3169.29,708.66 59.06,826.77 3169.29,826.77 59.06,944.88 3169.29,944.88 59.06,1062.99 3169.29,1062.99 59.06,1181.1 3169.29,1181.1 59.06,1299.21 3169.29,1299.21 59.06,1417.32 3169.29,1417.32 2622.05,1484.25 59.06,1535.43 3169.29,1535.43 59.06,1653.54 3169.29,1653.54 1997.64,1748.03 59.06,1771.65 1209,1827 1051.57,1866.14 1090.94,1866.54 59.06,1889.76 3169.29,1889.76 59.06,2007.87 3169.29,2007.87 59.06,2125.98 3169.29,2125.98 1660.01,2159.88 1698.03,2160.24 1659.02,2196.29 59.06,2244.09 3169.29,2244.09 59.05,2362.2 3169.29,2362.2 59.05,2480.32 3169.29,2480.32 59.06,2598.43 3169.29,2598.43 59.06,2716.54 3169.29,2716.54 59.06,2834.65 3169.29,2834.65 59.06,2952.76 3169.29,2952.76 59.06,3070.87 3169.29,3070.87 59.06,3188.98 3169.29,3188.98 59.06,3307.09 3169.29,3307.09 59.06,3425.2 3169.29,3425.2 59.06,3543.31 3169.29,3543.31 59.06,3661.42 3169.29,3661.42 59.06,3779.53 3169.29,3779.53 59.06,3897.64 3169.29,3897.64 59.06,4015.75 3169.29,4015.75 157.48,4094.49 275.59,4094.49 2952.76,4094.49 3070.87,4094.49 354.33,4145.67 2874.02,4145.67 446,4200.8 564.11,4200.8 682.22,4200.8 800.33,4200.8 905.51,4200.79 1023.62,4200.79 1141.73,4200.79 1259.84,4200.79 1614.17,4200.79 1732.28,4200.79 1850.39,4200.79 1968.5,4200.79 2086.61,4200.79 2204.72,4200.79 2322.83,4200.79 2440.94,4200.79 2559.06,4200.79 2677.17,4200.79 2795.28,4200.79 129.92,4240.16 3106.3,4240.16 68.68,4265.53 191.17,4265.53 3045.05,4265.53 3167.54,4265.53 43.31,4326.77 216.54,4326.77 3019.68,4326.77 3192.91,4326.77 68.68,4388.02 191.17,4388.02 3045.05,4388.02 3167.54,4388.02 129.92,4413.39 3106.3,4413.39

## Polygon pours and split planes (outlines as drawn)
2V5 on Top Layer "Top Layer-2V5" (solid, remove dead copper, pour order 1002): 1716.1,2476.73 1803.67,2476.73 1809.58,2470.82 1809.58,2379.31 1816.46,2372.42 1816.46,2167.75 1800.72,2152.01 1796.78,2148.07 1616.71,2148.07 1602.94,2161.85 1602.94,2383.25 1696.42,2476.73
AGND on Top Layer "Top Layer-AGND" (solid, remove dead copper, pour order 1003): 2465.9,2060.5 3037.61,2060.5 3072.05,2026.06 3072.05,1665.91 3039.58,1633.44 2393.09,1633.44 2373.41,1653.12 2373.41,2011.3 2423.59,2061.48
GND on Top Layer "Top Layer-GND 1" (solid, remove dead copper, pour order 1004): 382.78,4258.75 2892.96,4258.75 2965.78,4185.94 3010.06,4141.66 3148.8,4141.66 3195.05,4095.41 3195.05,56.09 3165.53,26.57 1784.98,26.57 1759.39,52.15 1759.39,235.18 1742.66,251.9 1487.81,251.9 1475.02,239.11 1475.02,31.49 1459.27,15.74 43.3,15.74 27.55,31.49 27.55,4085.57 105.29,4163.3 267.65,4163.3 363.1,4258.75
GND on MidLayer1 "GND-LAYER1" (solid, remove dead copper, pour order 1000): 35.43,35.43 35.43,185.04 35.43,4015.75 409.45,4389.76 421.26,4401.57 657.48,4401.57 2830.71,4401.57 3196.85,4035.43 3196.85,3811.02 3196.85,35.43
1V2 on MidLayer2 "MidLayer2-1V2" (solid, remove dead copper, pour order 1005): 1676.74,2176.61 1936.51,2176.61 1987.68,2125.44 1987.68,1142.42 1951.27,1106.02 1278.22,1106.02 1264.44,1119.79 1264.44,1855.82 1584.24,2175.62
GND on MidLayer2 "MidLayer2-GND 1" (solid, remove dead copper, pour order 1006): 393.6,4291.22 2968.73,4291.22 3189.14,4070.81 3189.14,68.88 3163.56,43.3 59.04,43.3 28.54,73.8 28.54,4057.03 262.73,4291.22
GND on MidLayer3 "GND-LAYER3" (solid, remove dead copper, pour order 1001): 35.43,35.43 3196.85,35.43 3196.85,279.53 3196.85,4007.87 2803.15,4401.57 2590.55,4401.57 425.2,4401.57 35.43,4011.81
GND on MidLayer4 "MidLayer4-GND 1" (solid, remove dead copper, pour order 1008): 410.33,4314.84 2890.99,4314.84 3198,4007.83 3198,83.64 3162.58,48.22 3147.82,33.46 79.7,33.46 45.26,67.9 45.26,4049.16 310.94,4314.84
1V2 on MidLayer4 "MidLayer4-1V2 1" (solid, remove dead copper, pour order 1007): 1122.53,2152.01 3105.72,2152.01 3143.88,2120.52 3143.88,757.68 3098.56,720.29 900.72,720.29 724.22,865.92 724.22,2043.77 855.4,2152.01
2V5 on Bottom Layer "Bottom Layer-2V5 1" (solid, remove dead copper, pour order 1009): 980.06,2238.6 2524.94,2238.6 2555.45,2208.1 2555.45,718.32 2523.96,686.83 844.27,686.83 785.23,745.87 785.23,2067.38 956.45,2238.6
GND on Bottom Layer "Bottom Layer-GND 1" (solid, remove dead copper, pour order 1010): 45.26,4013.74 45.26,111.19 107.26,49.2 3131.09,49.2 3181.27,99.38 3181.27,4026.53 2803.42,4404.38 473.3,4404.38
GND on GND-Layer5 (split plane): 1523.62,4436.6 3216.12,4436.6 3216.12,20.1 20.1,20.1 20.1,4436.6 1523.62,4436.6
3V3 on VCC (split plane): 2701.84,4061.24 2702.17,4058.67 2703.17,4056.27 2704.74,4054.22 2720.98,4037.98 2721.87,4037.3 2723.04,4036.4 2725.43,4035.41 2728,4035.07 3041.89,4035.07 3106.07,3970.89 3106.07,2319.11 3064.6,2277.64 2921.43,2277.64 2802.3,2396.78 2800.24,2398.36 2797.84,2399.35 2795.28,2399.69 2629.92,2399.69 2627.35,2399.35 2624.96,2398.36 2622.9,2396.78 2617,2390.88 2615.42,2388.82 2614.43,2386.43 2614.09,2383.86 2614.09,2206.87 2429.99,2022.77 2428.41,2020.71 2427.42,2018.32 2427.08,2015.75 2427.08,1590.55 2427.42,1587.98 2428.41,1585.59 2429.99,1583.53 2445.74,1567.78 2447.79,1566.21 2450.19,1565.21 2452.76,1564.88 2582.68,1564.88 2585.25,1565.21 2587.64,1566.21 2589.7,1567.78 2618.29,1596.37 2712.19,1596.37 2725.07,1583.49 2725.07,1440 2725.41,1437.43 2726.4,1435.04 2727.98,1432.98 2732.98,1427.98 2735.04,1426.4 2737.43,1425.41 2740,1425.07 3005.77,1425.07 3045.19,1385.65 3045.19,1287.4 3045.19,1244.09 3045.19,795.45 2948.64,698.9 2838.58,698.9 2836.01,698.57 2833.62,697.57 2831.56,696 2780.38,644.82 2778.8,642.76 2777.81,640.36 2777.47,637.8 2777.47,523.8 2617,363.32 2615.42,361.26 2614.43,358.87 2614.09,356.3 2614.09,40.66 42.65,40.66 40.66,42.65 40.66,621.47 41.48,623.01 42.33,625.84 42.62,628.78 42.62,4330.71 129.92,4330.71 129.92,4417.85 2701.84,4417.85
5V0 on VCC (split plane): 3102.36,4334.65 3195.72,4334.65 3195.72,40.66 2633.94,40.66 2633.94,352.19 2794.42,512.67 2796,514.72 2796.99,517.12 2797.33,519.68 2797.33,633.68 2842.69,679.05 2952.76,679.05 2955.33,679.39 2957.72,680.38 2959.78,681.96 3062.14,784.32 3063.03,785.48 3063.72,786.37 3064.01,787.08 3064.71,788.77 3065.05,791.34 3065.05,1244.09 3065.05,1287.4 3065.05,1389.76 3064.71,1392.33 3063.72,1394.73 3062.82,1395.89 3062.14,1396.78 3016.9,1442.02 3014.85,1443.6 3012.45,1444.59 3009.88,1444.93 2744.93,1444.93 2744.93,1587.6 2744.59,1590.17 2743.6,1592.56 2742.02,1594.62 2723.32,1613.32 2721.26,1614.9 2718.87,1615.89 2716.3,1616.23 2614.17,1616.23 2611.6,1615.89 2609.21,1614.9 2607.15,1613.32 2578.57,1584.73 2456.87,1584.73 2446.94,1594.66 2446.94,2011.64 2631.04,2195.74 2632.61,2197.79 2633.6,2200.19 2633.94,2202.76 2633.94,2379.75 2634.03,2379.84 2791.16,2379.84 2910.3,2260.7 2911.2,2260.01 2912.36,2259.12 2914.75,2258.13 2917.32,2257.79 3068.72,2257.79 3071.29,2258.13 3073.68,2259.12 3075.74,2260.7 3123.02,2307.98 3124.6,2310.04 3125.59,2312.43 3125.93,2315 3125.93,3975 3125.59,3977.57 3124.6,3979.96 3123.7,3981.13 3123.02,3982.02 3053.02,4052.02 3050.96,4053.6 3048.57,4054.59 3046,4054.93 2732.11,4054.93 2721.69,4065.35 2721.69,4417.85 3102.36,4417.85
no net on VCC (split plane): 20.1,4435.96 20.1,4436.6 20.74,4436.6
no net on VCC (split plane): 20.58,20.1 20.1,20.1 20.1,20.58

## Keep-outs
Bottom Layer:
  rectangle: 1310.91,4194.61 1507.76,4289.09
  rectangle: 255.91,3149.61 452.76,3244.09
  rectangle: 2643.7,3334.65 2840.55,3417.32
Keep-Out Layer:
  circle w15.75: c2928.82,472.44 r118.11
  circle w15.75: c857.95,472.44 r118.11
  circle w15.75: c306.77,437.01 r118.11
  circle w15.75: c306.77,2507.87 r118.11
  circle w15.75: c857.95,2472.44 r118.11
  circle w15.75: c2928.82,2472.44 r118.11
  region: 0,4456.69 0,4433.07 3236.22,4433.07 3236.22,4456.69
  rectangle: 0,0 3236.22,23.62
  rectangle: 0,0 23.62,4456.69
  region: 3236.22,4456.69 3212.6,4456.69 3212.6,0 3236.22,0
Mechanical 4:
  rectangle: 236.22,4358.27 925.2,4456.69

## Other copper
Top Layer:
  rectangle net GND: 3011.81,1366.15 3031.49,1405.52
  rectangle net 5V0: 2839.82,1449.65 2955.14,1558.01
  rectangle net 5V0: 2885.41,1496.66 3016.97,1700.34
  rectangle net AGND: 2515.6,1915.2 2523.6,1942.4
  region net LX: 2768.7,1716.54 2645.67,1716.54 2645.67,1622.32 2768.7,1622.32
  rectangle net 5V0: 2645.67,2251.97 2740.16,2393.7
  rectangle net GND: 2645.67,2551.18 2740.16,2692.91
  rectangle net GND: 3093.5,1773.6 3142.6,1785.4
  rectangle net 3V3: 2850.39,2100 3027.56,2195
  pour cut-out: 2039.41,956.65 2039.41,1984.21 2039.37,1984.25 1009.41,1984.25 1009.29,1984.37 1009.29,958.11 1007.87,956.69
  pour cut-out: 2554.02,3195 2554.02,2865 2194.02,2865 2194.02,3195
MidLayer4:
  rectangle net 5V0: 2625,2240 2755,2370